# Altium PCB Pod_Islands_Panel.PcbDoc (part 9 of 10)
Units mm, origin at the board's own origin, x right, y up, seen from the top; angles counter-clockwise.
Board outline 95.7 x 83.7 mm, 6 copper layers (Top Layer, Inner1, Inner2, Inner3, Inner4, Bottom Layer), stack 0.82 mm thick; 1100 components, 940 nets, 4944 pads, 3680 vias.
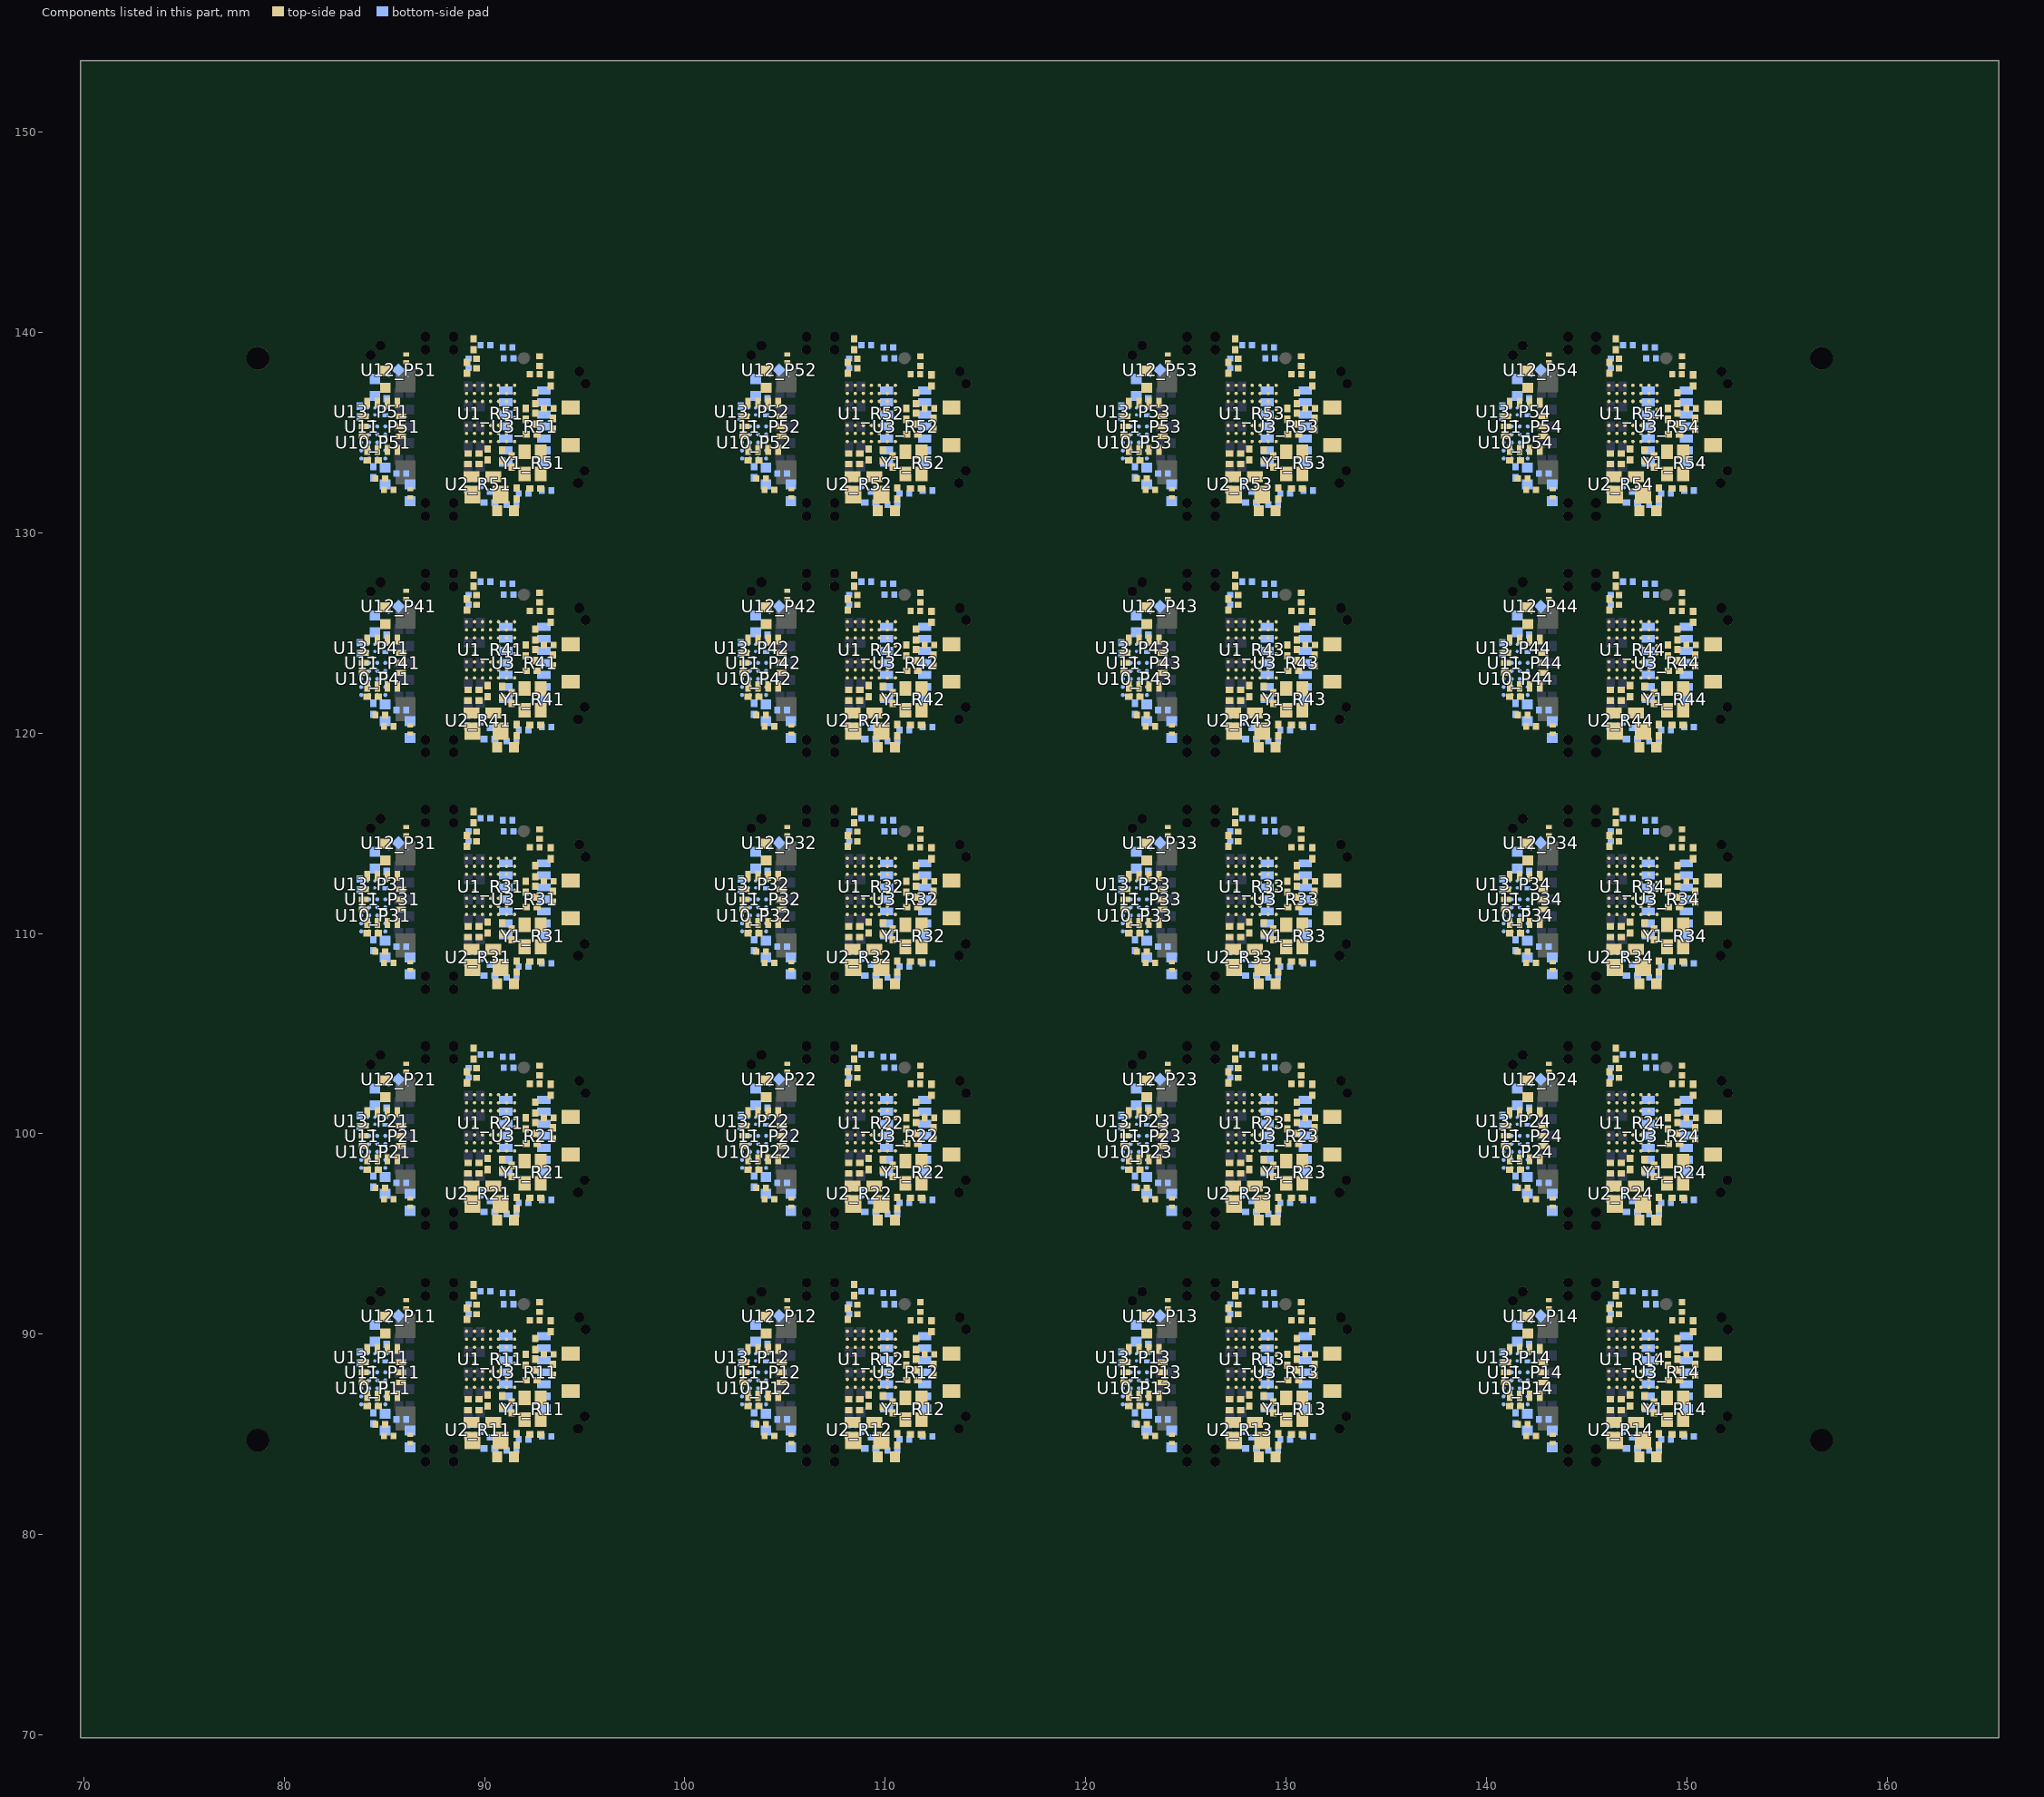
[diagram p13: the components of this part, seen from the top]

## Polygon pours and split planes (outlines as drawn)
GND_R11 on Inner1 (solid, remove dead copper): 87.981,93.649 87.981,82.473 95.855,82.473 95.855,93.649
GND_R11 on Inner4 (solid, remove dead copper): 87.981,93.649 87.981,82.473 95.855,82.473 95.855,93.649
GND_R11 on Top Layer (solid, remove dead copper, pour order 4): 87.981,93.649 87.981,82.473 95.855,82.473 95.855,93.649
GND_R11 on Bottom Layer (solid, remove dead copper, pour order 44): 87.981,93.649 87.981,82.473 95.855,82.473 95.855,93.649
GND_P11 on Inner4 (solid, remove dead copper): 82.981,93.014 82.981,83.108 87.045,83.108 87.045,93.014
GND_P11 on Inner1 (solid, remove dead copper): 82.981,93.014 82.981,83.108 87.045,83.108 87.045,93.014
GND_P21 on Inner4 (solid, remove dead copper): 82.981,104.814 82.981,94.908 87.045,94.908 87.045,104.814
GND_P21 on Inner1 (solid, remove dead copper): 82.981,104.814 82.981,94.908 87.045,94.908 87.045,104.814
GND_R21 on Inner1 (solid, remove dead copper): 87.981,105.449 87.981,94.273 95.855,94.273 95.855,105.449
GND_R21 on Inner4 (solid, remove dead copper): 87.981,105.449 87.981,94.273 95.855,94.273 95.855,105.449
GND_R21 on Top Layer (solid, remove dead copper, pour order 44): 87.981,105.449 87.981,94.273 95.855,94.273 95.855,105.449
GND_R21 on Bottom Layer (solid, remove dead copper, pour order 84): 87.981,105.449 87.981,94.273 95.855,94.273 95.855,105.449
GND_P31 on Inner4 (solid, remove dead copper): 82.981,116.614 82.981,106.708 87.045,106.708 87.045,116.614
GND_P31 on Inner1 (solid, remove dead copper): 82.981,116.614 82.981,106.708 87.045,106.708 87.045,116.614
GND_R31 on Inner1 (solid, remove dead copper): 87.981,117.249 87.981,106.073 95.855,106.073 95.855,117.249
GND_R31 on Inner4 (solid, remove dead copper): 87.981,117.249 87.981,106.073 95.855,106.073 95.855,117.249
GND_R31 on Top Layer (solid, remove dead copper, pour order 80): 87.981,117.249 87.981,106.073 95.855,106.073 95.855,117.249
GND_R31 on Bottom Layer (solid, remove dead copper, pour order 120): 87.981,117.249 87.981,106.073 95.855,106.073 95.855,117.249
GND_P41 on Inner4 (solid, remove dead copper): 82.981,128.414 82.981,118.508 87.045,118.508 87.045,128.414
GND_P41 on Inner1 (solid, remove dead copper): 82.981,128.414 82.981,118.508 87.045,118.508 87.045,128.414
GND_R41 on Inner1 (solid, remove dead copper): 87.981,129.049 87.981,117.873 95.855,117.873 95.855,129.049
GND_R41 on Inner4 (solid, remove dead copper): 87.981,129.049 87.981,117.873 95.855,117.873 95.855,129.049
GND_R41 on Top Layer (solid, remove dead copper, pour order 78): 87.981,129.049 87.981,117.873 95.855,117.873 95.855,129.049
GND_R41 on Bottom Layer (solid, remove dead copper, pour order 118): 87.981,129.049 87.981,117.873 95.855,117.873 95.855,129.049
GND_P51 on Inner4 (solid, remove dead copper): 82.981,140.214 82.981,130.308 87.045,130.308 87.045,140.214
GND_P51 on Inner1 (solid, remove dead copper): 82.981,140.214 82.981,130.308 87.045,130.308 87.045,140.214
GND_R51 on Inner1 (solid, remove dead copper): 87.981,140.849 87.981,129.673 95.855,129.673 95.855,140.849
GND_R51 on Inner4 (solid, remove dead copper): 87.981,140.849 87.981,129.673 95.855,129.673 95.855,140.849
GND_R51 on Top Layer (solid, remove dead copper, pour order 76): 87.981,140.849 87.981,129.673 95.855,129.673 95.855,140.849
GND_R51 on Bottom Layer (solid, remove dead copper, pour order 116): 87.981,140.849 87.981,129.673 95.855,129.673 95.855,140.849
GND_P12 on Inner4 (solid, remove dead copper): 101.981,93.014 101.981,83.108 106.045,83.108 106.045,93.014
GND_P12 on Inner1 (solid, remove dead copper): 101.981,93.014 101.981,83.108 106.045,83.108 106.045,93.014
GND_R12 on Inner1 (solid, remove dead copper): 106.981,93.649 106.981,82.473 114.855,82.473 114.855,93.649
GND_R12 on Inner4 (solid, remove dead copper): 106.981,93.649 106.981,82.473 114.855,82.473 114.855,93.649
GND_R12 on Top Layer (solid, remove dead copper, pour order 74): 106.981,93.649 106.981,82.473 114.855,82.473 114.855,93.649
GND_R12 on Bottom Layer (solid, remove dead copper, pour order 114): 106.981,93.649 106.981,82.473 114.855,82.473 114.855,93.649
GND_P22 on Inner4 (solid, remove dead copper): 101.981,104.814 101.981,94.908 106.045,94.908 106.045,104.814
GND_P22 on Inner1 (solid, remove dead copper): 101.981,104.814 101.981,94.908 106.045,94.908 106.045,104.814
GND_R22 on Inner1 (solid, remove dead copper): 106.981,105.449 106.981,94.273 114.855,94.273 114.855,105.449
GND_R22 on Inner4 (solid, remove dead copper): 106.981,105.449 106.981,94.273 114.855,94.273 114.855,105.449
GND_R22 on Top Layer (solid, remove dead copper, pour order 72): 106.981,105.449 106.981,94.273 114.855,94.273 114.855,105.449
GND_R22 on Bottom Layer (solid, remove dead copper, pour order 112): 106.981,105.449 106.981,94.273 114.855,94.273 114.855,105.449
GND_P32 on Inner4 (solid, remove dead copper): 101.981,116.614 101.981,106.708 106.045,106.708 106.045,116.614
GND_P32 on Inner1 (solid, remove dead copper): 101.981,116.614 101.981,106.708 106.045,106.708 106.045,116.614
GND_R32 on Inner1 (solid, remove dead copper): 106.981,117.249 106.981,106.073 114.855,106.073 114.855,117.249
GND_R32 on Inner4 (solid, remove dead copper): 106.981,117.249 106.981,106.073 114.855,106.073 114.855,117.249
GND_R32 on Top Layer (solid, remove dead copper, pour order 70): 106.981,117.249 106.981,106.073 114.855,106.073 114.855,117.249
GND_R32 on Bottom Layer (solid, remove dead copper, pour order 110): 106.981,117.249 106.981,106.073 114.855,106.073 114.855,117.249
GND_P42 on Inner4 (solid, remove dead copper): 101.981,128.414 101.981,118.508 106.045,118.508 106.045,128.414
GND_P42 on Inner1 (solid, remove dead copper): 101.981,128.414 101.981,118.508 106.045,118.508 106.045,128.414
GND_R42 on Inner1 (solid, remove dead copper): 106.981,129.049 106.981,117.873 114.855,117.873 114.855,129.049
GND_R42 on Inner4 (solid, remove dead copper): 106.981,129.049 106.981,117.873 114.855,117.873 114.855,129.049
GND_R42 on Top Layer (solid, remove dead copper, pour order 68): 106.981,129.049 106.981,117.873 114.855,117.873 114.855,129.049
GND_R42 on Bottom Layer (solid, remove dead copper, pour order 108): 106.981,129.049 106.981,117.873 114.855,117.873 114.855,129.049
GND_P52 on Inner4 (solid, remove dead copper): 101.981,140.214 101.981,130.308 106.045,130.308 106.045,140.214
GND_P52 on Inner1 (solid, remove dead copper): 101.981,140.214 101.981,130.308 106.045,130.308 106.045,140.214
GND_R52 on Inner1 (solid, remove dead copper): 106.981,140.849 106.981,129.673 114.855,129.673 114.855,140.849
GND_R52 on Inner4 (solid, remove dead copper): 106.981,140.849 106.981,129.673 114.855,129.673 114.855,140.849
GND_R52 on Top Layer (solid, remove dead copper, pour order 66): 106.981,140.849 106.981,129.673 114.855,129.673 114.855,140.849
GND_R52 on Bottom Layer (solid, remove dead copper, pour order 106): 106.981,140.849 106.981,129.673 114.855,129.673 114.855,140.849
GND_P13 on Inner4 (solid, remove dead copper): 120.981,93.014 120.981,83.108 125.045,83.108 125.045,93.014
GND_P13 on Inner1 (solid, remove dead copper): 120.981,93.014 120.981,83.108 125.045,83.108 125.045,93.014
GND_R13 on Inner1 (solid, remove dead copper): 125.981,93.649 125.981,82.473 133.855,82.473 133.855,93.649
GND_R13 on Inner4 (solid, remove dead copper): 125.981,93.649 125.981,82.473 133.855,82.473 133.855,93.649
GND_R13 on Top Layer (solid, remove dead copper, pour order 64): 125.981,93.649 125.981,82.473 133.855,82.473 133.855,93.649
GND_R13 on Bottom Layer (solid, remove dead copper, pour order 104): 125.981,93.649 125.981,82.473 133.855,82.473 133.855,93.649
GND_P23 on Inner4 (solid, remove dead copper): 120.981,104.814 120.981,94.908 125.045,94.908 125.045,104.814
GND_P23 on Inner1 (solid, remove dead copper): 120.981,104.814 120.981,94.908 125.045,94.908 125.045,104.814
GND_R23 on Inner1 (solid, remove dead copper): 125.981,105.449 125.981,94.273 133.855,94.273 133.855,105.449
GND_R23 on Inner4 (solid, remove dead copper): 125.981,105.449 125.981,94.273 133.855,94.273 133.855,105.449
GND_R23 on Top Layer (solid, remove dead copper, pour order 62): 125.981,105.449 125.981,94.273 133.855,94.273 133.855,105.449
GND_R23 on Bottom Layer (solid, remove dead copper, pour order 102): 125.981,105.449 125.981,94.273 133.855,94.273 133.855,105.449
GND_P33 on Inner4 (solid, remove dead copper): 120.981,116.614 120.981,106.708 125.045,106.708 125.045,116.614
GND_P33 on Inner1 (solid, remove dead copper): 120.981,116.614 120.981,106.708 125.045,106.708 125.045,116.614
GND_R33 on Inner1 (solid, remove dead copper): 125.981,117.249 125.981,106.073 133.855,106.073 133.855,117.249
GND_R33 on Inner4 (solid, remove dead copper): 125.981,117.249 125.981,106.073 133.855,106.073 133.855,117.249
GND_R33 on Top Layer (solid, remove dead copper, pour order 60): 125.981,117.249 125.981,106.073 133.855,106.073 133.855,117.249
GND_R33 on Bottom Layer (solid, remove dead copper, pour order 100): 125.981,117.249 125.981,106.073 133.855,106.073 133.855,117.249
GND_P43 on Inner4 (solid, remove dead copper): 120.981,128.414 120.981,118.508 125.045,118.508 125.045,128.414
GND_P43 on Inner1 (solid, remove dead copper): 120.981,128.414 120.981,118.508 125.045,118.508 125.045,128.414
GND_R43 on Inner1 (solid, remove dead copper): 125.981,129.049 125.981,117.873 133.855,117.873 133.855,129.049
GND_R43 on Inner4 (solid, remove dead copper): 125.981,129.049 125.981,117.873 133.855,117.873 133.855,129.049
GND_R43 on Top Layer (solid, remove dead copper, pour order 58): 125.981,129.049 125.981,117.873 133.855,117.873 133.855,129.049
GND_R43 on Bottom Layer (solid, remove dead copper, pour order 98): 125.981,129.049 125.981,117.873 133.855,117.873 133.855,129.049
GND_P53 on Inner4 (solid, remove dead copper): 120.981,140.214 120.981,130.308 125.045,130.308 125.045,140.214
GND_P53 on Inner1 (solid, remove dead copper): 120.981,140.214 120.981,130.308 125.045,130.308 125.045,140.214
GND_R53 on Inner1 (solid, remove dead copper): 125.981,140.849 125.981,129.673 133.855,129.673 133.855,140.849
GND_R53 on Inner4 (solid, remove dead copper): 125.981,140.849 125.981,129.673 133.855,129.673 133.855,140.849
GND_R53 on Top Layer (solid, remove dead copper, pour order 56): 125.981,140.849 125.981,129.673 133.855,129.673 133.855,140.849
GND_R53 on Bottom Layer (solid, remove dead copper, pour order 96): 125.981,140.849 125.981,129.673 133.855,129.673 133.855,140.849
GND_P14 on Inner4 (solid, remove dead copper): 139.981,93.014 139.981,83.108 144.045,83.108 144.045,93.014
GND_P14 on Inner1 (solid, remove dead copper): 139.981,93.014 139.981,83.108 144.045,83.108 144.045,93.014
GND_R14 on Inner1 (solid, remove dead copper): 144.981,93.649 144.981,82.473 152.855,82.473 152.855,93.649
GND_R14 on Inner4 (solid, remove dead copper): 144.981,93.649 144.981,82.473 152.855,82.473 152.855,93.649
GND_R14 on Top Layer (solid, remove dead copper, pour order 54): 144.981,93.649 144.981,82.473 152.855,82.473 152.855,93.649
GND_R14 on Bottom Layer (solid, remove dead copper, pour order 94): 144.981,93.649 144.981,82.473 152.855,82.473 152.855,93.649
GND_P24 on Inner4 (solid, remove dead copper): 139.981,104.814 139.981,94.908 144.045,94.908 144.045,104.814
GND_P24 on Inner1 (solid, remove dead copper): 139.981,104.814 139.981,94.908 144.045,94.908 144.045,104.814
GND_R24 on Inner1 (solid, remove dead copper): 144.981,105.449 144.981,94.273 152.855,94.273 152.855,105.449
GND_R24 on Inner4 (solid, remove dead copper): 144.981,105.449 144.981,94.273 152.855,94.273 152.855,105.449
GND_R24 on Top Layer (solid, remove dead copper, pour order 52): 144.981,105.449 144.981,94.273 152.855,94.273 152.855,105.449
GND_R24 on Bottom Layer (solid, remove dead copper, pour order 92): 144.981,105.449 144.981,94.273 152.855,94.273 152.855,105.449
GND_P34 on Inner4 (solid, remove dead copper): 139.981,116.614 139.981,106.708 144.045,106.708 144.045,116.614
GND_P34 on Inner1 (solid, remove dead copper): 139.981,116.614 139.981,106.708 144.045,106.708 144.045,116.614
GND_R34 on Inner1 (solid, remove dead copper): 144.981,117.249 144.981,106.073 152.855,106.073 152.855,117.249
GND_R34 on Inner4 (solid, remove dead copper): 144.981,117.249 144.981,106.073 152.855,106.073 152.855,117.249
GND_R34 on Top Layer (solid, remove dead copper, pour order 50): 144.981,117.249 144.981,106.073 152.855,106.073 152.855,117.249
GND_R34 on Bottom Layer (solid, remove dead copper, pour order 90): 144.981,117.249 144.981,106.073 152.855,106.073 152.855,117.249
GND_P44 on Inner4 (solid, remove dead copper): 139.981,128.414 139.981,118.508 144.045,118.508 144.045,128.414
GND_P44 on Inner1 (solid, remove dead copper): 139.981,128.414 139.981,118.508 144.045,118.508 144.045,128.414
GND_R44 on Inner1 (solid, remove dead copper): 144.981,129.049 144.981,117.873 152.855,117.873 152.855,129.049
GND_R44 on Inner4 (solid, remove dead copper): 144.981,129.049 144.981,117.873 152.855,117.873 152.855,129.049
GND_R44 on Top Layer (solid, remove dead copper, pour order 48): 144.981,129.049 144.981,117.873 152.855,117.873 152.855,129.049
GND_R44 on Bottom Layer (solid, remove dead copper, pour order 88): 144.981,129.049 144.981,117.873 152.855,117.873 152.855,129.049
GND_P54 on Inner4 (solid, remove dead copper): 139.981,140.214 139.981,130.308 144.045,130.308 144.045,140.214
GND_P54 on Inner1 (solid, remove dead copper): 139.981,140.214 139.981,130.308 144.045,130.308 144.045,140.214
GND_R54 on Inner1 (solid, remove dead copper): 144.981,140.849 144.981,129.673 152.855,129.673 152.855,140.849
GND_R54 on Inner4 (solid, remove dead copper): 144.981,140.849 144.981,129.673 152.855,129.673 152.855,140.849
GND_R54 on Top Layer (solid, remove dead copper, pour order 46): 144.981,140.849 144.981,129.673 152.855,129.673 152.855,140.849
GND_R54 on Bottom Layer (solid, remove dead copper, pour order 86): 144.981,140.849 144.981,129.673 152.855,129.673 152.855,140.849

## Keep-outs
Top Layer:
  drawing of 160 lines, arcs and shapes, not listed
Inner1:
  region: 93.66,84.465 93.66,91.735 93.884,91.515 94.093,91.281 94.287,91.034 94.465,90.775 94.626,90.506 94.77,90.227 94.896,89.939 95.003,89.644 95.092,89.343 95.161,89.036 95.21,88.726 95.24,88.414 95.25,88.1 95.24,87.786 95.21,87.474 95.161,87.164 95.092,86.857 95.003,86.556 94.896,86.261 94.77,85.973 94.626,85.694 94.465,85.425 94.287,85.166 94.093,84.919 93.884,84.685 93.66,84.465
  region: 93.66,96.265 93.66,103.535 93.884,103.315 94.093,103.081 94.287,102.834 94.465,102.575 94.626,102.306 94.77,102.027 94.896,101.739 95.003,101.444 95.092,101.143 95.161,100.836 95.21,100.526 95.24,100.214 95.25,99.9 95.24,99.586 95.21,99.274 95.161,98.964 95.092,98.657 95.003,98.356 94.896,98.061 94.77,97.773 94.626,97.494 94.465,97.225 94.287,96.966 94.093,96.719 93.884,96.485 93.66,96.265
  region: 93.66,108.065 93.66,115.335 93.884,115.115 94.093,114.881 94.287,114.634 94.465,114.375 94.626,114.106 94.77,113.827 94.896,113.539 95.003,113.244 95.092,112.943 95.161,112.636 95.21,112.326 95.24,112.014 95.25,111.7 95.24,111.386 95.21,111.074 95.161,110.764 95.092,110.457 95.003,110.156 94.896,109.861 94.77,109.573 94.626,109.294 94.465,109.025 94.287,108.766 94.093,108.519 93.884,108.285 93.66,108.065
  region: 93.66,119.865 93.66,127.135 93.884,126.915 94.093,126.681 94.287,126.434 94.465,126.175 94.626,125.906 94.77,125.627 94.896,125.339 95.003,125.044 95.092,124.743 95.161,124.436 95.21,124.126 95.24,123.814 95.25,123.5 95.24,123.186 95.21,122.874 95.161,122.564 95.092,122.257 95.003,121.956 94.896,121.661 94.77,121.373 94.626,121.094 94.465,120.825 94.287,120.566 94.093,120.319 93.884,120.085 93.66,119.865
  region: 93.66,131.665 93.66,138.935 93.884,138.715 94.093,138.481 94.287,138.234 94.465,137.975 94.626,137.706 94.77,137.427 94.896,137.139 95.003,136.844 95.092,136.543 95.161,136.236 95.21,135.926 95.24,135.614 95.25,135.3 95.24,134.986 95.21,134.674 95.161,134.364 95.092,134.057 95.003,133.756 94.896,133.461 94.77,133.173 94.626,132.894 94.465,132.625 94.287,132.366 94.093,132.119 93.884,131.885 93.66,131.665
  region: 112.66,84.465 112.66,91.735 112.884,91.515 113.093,91.281 113.287,91.034 113.465,90.775 113.626,90.506 113.77,90.227 113.896,89.939 114.003,89.644 114.092,89.343 114.161,89.036 114.21,88.726 114.24,88.414 114.25,88.1 114.24,87.786 114.21,87.474 114.161,87.164 114.092,86.857 114.003,86.556 113.896,86.261 113.77,85.973 113.626,85.694 113.465,85.425 113.287,85.166 113.093,84.919 112.884,84.685 112.66,84.465
  region: 112.66,96.265 112.66,103.535 112.884,103.315 113.093,103.081 113.287,102.834 113.465,102.575 113.626,102.306 113.77,102.027 113.896,101.739 114.003,101.444 114.092,101.143 114.161,100.836 114.21,100.526 114.24,100.214 114.25,99.9 114.24,99.586 114.21,99.274 114.161,98.964 114.092,98.657 114.003,98.356 113.896,98.061 113.77,97.773 113.626,97.494 113.465,97.225 113.287,96.966 113.093,96.719 112.884,96.485 112.66,96.265
  region: 112.66,108.065 112.66,115.335 112.884,115.115 113.093,114.881 113.287,114.634 113.465,114.375 113.626,114.106 113.77,113.827 113.896,113.539 114.003,113.244 114.092,112.943 114.161,112.636 114.21,112.326 114.24,112.014 114.25,111.7 114.24,111.386 114.21,111.074 114.161,110.764 114.092,110.457 114.003,110.156 113.896,109.861 113.77,109.573 113.626,109.294 113.465,109.025 113.287,108.766 113.093,108.519 112.884,108.285 112.66,108.065
  region: 112.66,119.865 112.66,127.135 112.884,126.915 113.093,126.681 113.287,126.434 113.465,126.175 113.626,125.906 113.77,125.627 113.896,125.339 114.003,125.044 114.092,124.743 114.161,124.436 114.21,124.126 114.24,123.814 114.25,123.5 114.24,123.186 114.21,122.874 114.161,122.564 114.092,122.257 114.003,121.956 113.896,121.661 113.77,121.373 113.626,121.094 113.465,120.825 113.287,120.566 113.093,120.319 112.884,120.085 112.66,119.865
  region: 112.66,131.665 112.66,138.935 112.884,138.715 113.093,138.481 113.287,138.234 113.465,137.975 113.626,137.706 113.77,137.427 113.896,137.139 114.003,136.844 114.092,136.543 114.161,136.236 114.21,135.926 114.24,135.614 114.25,135.3 114.24,134.986 114.21,134.674 114.161,134.364 114.092,134.057 114.003,133.756 113.896,133.461 113.77,133.173 113.626,132.894 113.465,132.625 113.287,132.366 113.093,132.119 112.884,131.885 112.66,131.665
  region: 131.66,84.465 131.66,91.735 131.884,91.515 132.093,91.281 132.287,91.034 132.465,90.775 132.626,90.506 132.77,90.227 132.896,89.939 133.003,89.644 133.092,89.343 133.161,89.036 133.21,88.726 133.24,88.414 133.25,88.1 133.24,87.786 133.21,87.474 133.161,87.164 133.092,86.857 133.003,86.556 132.896,86.261 132.77,85.973 132.626,85.694 132.465,85.425 132.287,85.166 132.093,84.919 131.884,84.685 131.66,84.465
  region: 131.66,96.265 131.66,103.535 131.884,103.315 132.093,103.081 132.287,102.834 132.465,102.575 132.626,102.306 132.77,102.027 132.896,101.739 133.003,101.444 133.092,101.143 133.161,100.836 133.21,100.526 133.24,100.214 133.25,99.9 133.24,99.586 133.21,99.274 133.161,98.964 133.092,98.657 133.003,98.356 132.896,98.061 132.77,97.773 132.626,97.494 132.465,97.225 132.287,96.966 132.093,96.719 131.884,96.485 131.66,96.265
  region: 131.66,108.065 131.66,115.335 131.884,115.115 132.093,114.881 132.287,114.634 132.465,114.375 132.626,114.106 132.77,113.827 132.896,113.539 133.003,113.244 133.092,112.943 133.161,112.636 133.21,112.326 133.24,112.014 133.25,111.7 133.24,111.386 133.21,111.074 133.161,110.764 133.092,110.457 133.003,110.156 132.896,109.861 132.77,109.573 132.626,109.294 132.465,109.025 132.287,108.766 132.093,108.519 131.884,108.285 131.66,108.065
  region: 131.66,119.865 131.66,127.135 131.884,126.915 132.093,126.681 132.287,126.434 132.465,126.175 132.626,125.906 132.77,125.627 132.896,125.339 133.003,125.044 133.092,124.743 133.161,124.436 133.21,124.126 133.24,123.814 133.25,123.5 133.24,123.186 133.21,122.874 133.161,122.564 133.092,122.257 133.003,121.956 132.896,121.661 132.77,121.373 132.626,121.094 132.465,120.825 132.287,120.566 132.093,120.319 131.884,120.085 131.66,119.865
  region: 131.66,131.665 131.66,138.935 131.884,138.715 132.093,138.481 132.287,138.234 132.465,137.975 132.626,137.706 132.77,137.427 132.896,137.139 133.003,136.844 133.092,136.543 133.161,136.236 133.21,135.926 133.24,135.614 133.25,135.3 133.24,134.986 133.21,134.674 133.161,134.364 133.092,134.057 133.003,133.756 132.896,133.461 132.77,133.173 132.626,132.894 132.465,132.625 132.287,132.366 132.093,132.119 131.884,131.885 131.66,131.665
  region: 150.66,84.465 150.66,91.735 150.884,91.515 151.093,91.281 151.287,91.034 151.465,90.775 151.626,90.506 151.77,90.227 151.896,89.939 152.003,89.644 152.092,89.343 152.161,89.036 152.21,88.726 152.24,88.414 152.25,88.1 152.24,87.786 152.21,87.474 152.161,87.164 152.092,86.857 152.003,86.556 151.896,86.261 151.77,85.973 151.626,85.694 151.465,85.425 151.287,85.166 151.093,84.919 150.884,84.685 150.66,84.465
  region: 150.66,96.265 150.66,103.535 150.884,103.315 151.093,103.081 151.287,102.834 151.465,102.575 151.626,102.306 151.77,102.027 151.896,101.739 152.003,101.444 152.092,101.143 152.161,100.836 152.21,100.526 152.24,100.214 152.25,99.9 152.24,99.586 152.21,99.274 152.161,98.964 152.092,98.657 152.003,98.356 151.896,98.061 151.77,97.773 151.626,97.494 151.465,97.225 151.287,96.966 151.093,96.719 150.884,96.485 150.66,96.265
  region: 150.66,108.065 150.66,115.335 150.884,115.115 151.093,114.881 151.287,114.634 151.465,114.375 151.626,114.106 151.77,113.827 151.896,113.539 152.003,113.244 152.092,112.943 152.161,112.636 152.21,112.326 152.24,112.014 152.25,111.7 152.24,111.386 152.21,111.074 152.161,110.764 152.092,110.457 152.003,110.156 151.896,109.861 151.77,109.573 151.626,109.294 151.465,109.025 151.287,108.766 151.093,108.519 150.884,108.285 150.66,108.065
  region: 150.66,119.865 150.66,127.135 150.884,126.915 151.093,126.681 151.287,126.434 151.465,126.175 151.626,125.906 151.77,125.627 151.896,125.339 152.003,125.044 152.092,124.743 152.161,124.436 152.21,124.126 152.24,123.814 152.25,123.5 152.24,123.186 152.21,122.874 152.161,122.564 152.092,122.257 152.003,121.956 151.896,121.661 151.77,121.373 151.626,121.094 151.465,120.825 151.287,120.566 151.093,120.319 150.884,120.085 150.66,119.865
  region: 150.66,131.665 150.66,138.935 150.884,138.715 151.093,138.481 151.287,138.234 151.465,137.975 151.626,137.706 151.77,137.427 151.896,137.139 152.003,136.844 152.092,136.543 152.161,136.236 152.21,135.926 152.24,135.614 152.25,135.3 152.24,134.986 152.21,134.674 152.161,134.364 152.092,134.057 152.003,133.756 151.896,133.461 151.77,133.173 151.626,132.894 151.465,132.625 151.287,132.366 151.093,132.119 150.884,131.885 150.66,131.665
Inner2:
  region: 93.66,84.465 93.66,91.735 93.884,91.515 94.093,91.281 94.287,91.034 94.465,90.775 94.626,90.506 94.77,90.227 94.896,89.939 95.003,89.644 95.092,89.343 95.161,89.036 95.21,88.726 95.24,88.414 95.25,88.1 95.24,87.786 95.21,87.474 95.161,87.164 95.092,86.857 95.003,86.556 94.896,86.261 94.77,85.973 94.626,85.694 94.465,85.425 94.287,85.166 94.093,84.919 93.884,84.685 93.66,84.465
  region: 93.66,96.265 93.66,103.535 93.884,103.315 94.093,103.081 94.287,102.834 94.465,102.575 94.626,102.306 94.77,102.027 94.896,101.739 95.003,101.444 95.092,101.143 95.161,100.836 95.21,100.526 95.24,100.214 95.25,99.9 95.24,99.586 95.21,99.274 95.161,98.964 95.092,98.657 95.003,98.356 94.896,98.061 94.77,97.773 94.626,97.494 94.465,97.225 94.287,96.966 94.093,96.719 93.884,96.485 93.66,96.265
  region: 93.66,108.065 93.66,115.335 93.884,115.115 94.093,114.881 94.287,114.634 94.465,114.375 94.626,114.106 94.77,113.827 94.896,113.539 95.003,113.244 95.092,112.943 95.161,112.636 95.21,112.326 95.24,112.014 95.25,111.7 95.24,111.386 95.21,111.074 95.161,110.764 95.092,110.457 95.003,110.156 94.896,109.861 94.77,109.573 94.626,109.294 94.465,109.025 94.287,108.766 94.093,108.519 93.884,108.285 93.66,108.065
  region: 93.66,119.865 93.66,127.135 93.884,126.915 94.093,126.681 94.287,126.434 94.465,126.175 94.626,125.906 94.77,125.627 94.896,125.339 95.003,125.044 95.092,124.743 95.161,124.436 95.21,124.126 95.24,123.814 95.25,123.5 95.24,123.186 95.21,122.874 95.161,122.564 95.092,122.257 95.003,121.956 94.896,121.661 94.77,121.373 94.626,121.094 94.465,120.825 94.287,120.566 94.093,120.319 93.884,120.085 93.66,119.865
  region: 93.66,131.665 93.66,138.935 93.884,138.715 94.093,138.481 94.287,138.234 94.465,137.975 94.626,137.706 94.77,137.427 94.896,137.139 95.003,136.844 95.092,136.543 95.161,136.236 95.21,135.926 95.24,135.614 95.25,135.3 95.24,134.986 95.21,134.674 95.161,134.364 95.092,134.057 95.003,133.756 94.896,133.461 94.77,133.173 94.626,132.894 94.465,132.625 94.287,132.366 94.093,132.119 93.884,131.885 93.66,131.665
  region: 112.66,84.465 112.66,91.735 112.884,91.515 113.093,91.281 113.287,91.034 113.465,90.775 113.626,90.506 113.77,90.227 113.896,89.939 114.003,89.644 114.092,89.343 114.161,89.036 114.21,88.726 114.24,88.414 114.25,88.1 114.24,87.786 114.21,87.474 114.161,87.164 114.092,86.857 114.003,86.556 113.896,86.261 113.77,85.973 113.626,85.694 113.465,85.425 113.287,85.166 113.093,84.919 112.884,84.685 112.66,84.465
  region: 112.66,96.265 112.66,103.535 112.884,103.315 113.093,103.081 113.287,102.834 113.465,102.575 113.626,102.306 113.77,102.027 113.896,101.739 114.003,101.444 114.092,101.143 114.161,100.836 114.21,100.526 114.24,100.214 114.25,99.9 114.24,99.586 114.21,99.274 114.161,98.964 114.092,98.657 114.003,98.356 113.896,98.061 113.77,97.773 113.626,97.494 113.465,97.225 113.287,96.966 113.093,96.719 112.884,96.485 112.66,96.265
  region: 112.66,108.065 112.66,115.335 112.884,115.115 113.093,114.881 113.287,114.634 113.465,114.375 113.626,114.106 113.77,113.827 113.896,113.539 114.003,113.244 114.092,112.943 114.161,112.636 114.21,112.326 114.24,112.014 114.25,111.7 114.24,111.386 114.21,111.074 114.161,110.764 114.092,110.457 114.003,110.156 113.896,109.861 113.77,109.573 113.626,109.294 113.465,109.025 113.287,108.766 113.093,108.519 112.884,108.285 112.66,108.065
  region: 112.66,119.865 112.66,127.135 112.884,126.915 113.093,126.681 113.287,126.434 113.465,126.175 113.626,125.906 113.77,125.627 113.896,125.339 114.003,125.044 114.092,124.743 114.161,124.436 114.21,124.126 114.24,123.814 114.25,123.5 114.24,123.186 114.21,122.874 114.161,122.564 114.092,122.257 114.003,121.956 113.896,121.661 113.77,121.373 113.626,121.094 113.465,120.825 113.287,120.566 113.093,120.319 112.884,120.085 112.66,119.865
  region: 112.66,131.665 112.66,138.935 112.884,138.715 113.093,138.481 113.287,138.234 113.465,137.975 113.626,137.706 113.77,137.427 113.896,137.139 114.003,136.844 114.092,136.543 114.161,136.236 114.21,135.926 114.24,135.614 114.25,135.3 114.24,134.986 114.21,134.674 114.161,134.364 114.092,134.057 114.003,133.756 113.896,133.461 113.77,133.173 113.626,132.894 113.465,132.625 113.287,132.366 113.093,132.119 112.884,131.885 112.66,131.665
  region: 131.66,84.465 131.66,91.735 131.884,91.515 132.093,91.281 132.287,91.034 132.465,90.775 132.626,90.506 132.77,90.227 132.896,89.939 133.003,89.644 133.092,89.343 133.161,89.036 133.21,88.726 133.24,88.414 133.25,88.1 133.24,87.786 133.21,87.474 133.161,87.164 133.092,86.857 133.003,86.556 132.896,86.261 132.77,85.973 132.626,85.694 132.465,85.425 132.287,85.166 132.093,84.919 131.884,84.685 131.66,84.465
  region: 131.66,96.265 131.66,103.535 131.884,103.315 132.093,103.081 132.287,102.834 132.465,102.575 132.626,102.306 132.77,102.027 132.896,101.739 133.003,101.444 133.092,101.143 133.161,100.836 133.21,100.526 133.24,100.214 133.25,99.9 133.24,99.586 133.21,99.274 133.161,98.964 133.092,98.657 133.003,98.356 132.896,98.061 132.77,97.773 132.626,97.494 132.465,97.225 132.287,96.966 132.093,96.719 131.884,96.485 131.66,96.265
  region: 131.66,108.065 131.66,115.335 131.884,115.115 132.093,114.881 132.287,114.634 132.465,114.375 132.626,114.106 132.77,113.827 132.896,113.539 133.003,113.244 133.092,112.943 133.161,112.636 133.21,112.326 133.24,112.014 133.25,111.7 133.24,111.386 133.21,111.074 133.161,110.764 133.092,110.457 133.003,110.156 132.896,109.861 132.77,109.573 132.626,109.294 132.465,109.025 132.287,108.766 132.093,108.519 131.884,108.285 131.66,108.065
  region: 131.66,119.865 131.66,127.135 131.884,126.915 132.093,126.681 132.287,126.434 132.465,126.175 132.626,125.906 132.77,125.627 132.896,125.339 133.003,125.044 133.092,124.743 133.161,124.436 133.21,124.126 133.24,123.814 133.25,123.5 133.24,123.186 133.21,122.874 133.161,122.564 133.092,122.257 133.003,121.956 132.896,121.661 132.77,121.373 132.626,121.094 132.465,120.825 132.287,120.566 132.093,120.319 131.884,120.085 131.66,119.865
  region: 131.66,131.665 131.66,138.935 131.884,138.715 132.093,138.481 132.287,138.234 132.465,137.975 132.626,137.706 132.77,137.427 132.896,137.139 133.003,136.844 133.092,136.543 133.161,136.236 133.21,135.926 133.24,135.614 133.25,135.3 133.24,134.986 133.21,134.674 133.161,134.364 133.092,134.057 133.003,133.756 132.896,133.461 132.77,133.173 132.626,132.894 132.465,132.625 132.287,132.366 132.093,132.119 131.884,131.885 131.66,131.665
  region: 150.66,84.465 150.66,91.735 150.884,91.515 151.093,91.281 151.287,91.034 151.465,90.775 151.626,90.506 151.77,90.227 151.896,89.939 152.003,89.644 152.092,89.343 152.161,89.036 152.21,88.726 152.24,88.414 152.25,88.1 152.24,87.786 152.21,87.474 152.161,87.164 152.092,86.857 152.003,86.556 151.896,86.261 151.77,85.973 151.626,85.694 151.465,85.425 151.287,85.166 151.093,84.919 150.884,84.685 150.66,84.465
  region: 150.66,96.265 150.66,103.535 150.884,103.315 151.093,103.081 151.287,102.834 151.465,102.575 151.626,102.306 151.77,102.027 151.896,101.739 152.003,101.444 152.092,101.143 152.161,100.836 152.21,100.526 152.24,100.214 152.25,99.9 152.24,99.586 152.21,99.274 152.161,98.964 152.092,98.657 152.003,98.356 151.896,98.061 151.77,97.773 151.626,97.494 151.465,97.225 151.287,96.966 151.093,96.719 150.884,96.485 150.66,96.265
  region: 150.66,108.065 150.66,115.335 150.884,115.115 151.093,114.881 151.287,114.634 151.465,114.375 151.626,114.106 151.77,113.827 151.896,113.539 152.003,113.244 152.092,112.943 152.161,112.636 152.21,112.326 152.24,112.014 152.25,111.7 152.24,111.386 152.21,111.074 152.161,110.764 152.092,110.457 152.003,110.156 151.896,109.861 151.77,109.573 151.626,109.294 151.465,109.025 151.287,108.766 151.093,108.519 150.884,108.285 150.66,108.065
  region: 150.66,119.865 150.66,127.135 150.884,126.915 151.093,126.681 151.287,126.434 151.465,126.175 151.626,125.906 151.77,125.627 151.896,125.339 152.003,125.044 152.092,124.743 152.161,124.436 152.21,124.126 152.24,123.814 152.25,123.5 152.24,123.186 152.21,122.874 152.161,122.564 152.092,122.257 152.003,121.956 151.896,121.661 151.77,121.373 151.626,121.094 151.465,120.825 151.287,120.566 151.093,120.319 150.884,120.085 150.66,119.865
  region: 150.66,131.665 150.66,138.935 150.884,138.715 151.093,138.481 151.287,138.234 151.465,137.975 151.626,137.706 151.77,137.427 151.896,137.139 152.003,136.844 152.092,136.543 152.161,136.236 152.21,135.926 152.24,135.614 152.25,135.3 152.24,134.986 152.21,134.674 152.161,134.364 152.092,134.057 152.003,133.756 151.896,133.461 151.77,133.173 151.626,132.894 151.465,132.625 151.287,132.366 151.093,132.119 150.884,131.885 150.66,131.665
Inner3:
  region: 93.66,84.465 93.66,91.735 93.884,91.515 94.093,91.281 94.287,91.034 94.465,90.775 94.626,90.506 94.77,90.227 94.896,89.939 95.003,89.644 95.092,89.343 95.161,89.036 95.21,88.726 95.24,88.414 95.25,88.1 95.24,87.786 95.21,87.474 95.161,87.164 95.092,86.857 95.003,86.556 94.896,86.261 94.77,85.973 94.626,85.694 94.465,85.425 94.287,85.166 94.093,84.919 93.884,84.685 93.66,84.465
  region: 93.66,96.265 93.66,103.535 93.884,103.315 94.093,103.081 94.287,102.834 94.465,102.575 94.626,102.306 94.77,102.027 94.896,101.739 95.003,101.444 95.092,101.143 95.161,100.836 95.21,100.526 95.24,100.214 95.25,99.9 95.24,99.586 95.21,99.274 95.161,98.964 95.092,98.657 95.003,98.356 94.896,98.061 94.77,97.773 94.626,97.494 94.465,97.225 94.287,96.966 94.093,96.719 93.884,96.485 93.66,96.265
  region: 93.66,108.065 93.66,115.335 93.884,115.115 94.093,114.881 94.287,114.634 94.465,114.375 94.626,114.106 94.77,113.827 94.896,113.539 95.003,113.244 95.092,112.943 95.161,112.636 95.21,112.326 95.24,112.014 95.25,111.7 95.24,111.386 95.21,111.074 95.161,110.764 95.092,110.457 95.003,110.156 94.896,109.861 94.77,109.573 94.626,109.294 94.465,109.025 94.287,108.766 94.093,108.519 93.884,108.285 93.66,108.065
  region: 93.66,119.865 93.66,127.135 93.884,126.915 94.093,126.681 94.287,126.434 94.465,126.175 94.626,125.906 94.77,125.627 94.896,125.339 95.003,125.044 95.092,124.743 95.161,124.436 95.21,124.126 95.24,123.814 95.25,123.5 95.24,123.186 95.21,122.874 95.161,122.564 95.092,122.257 95.003,121.956 94.896,121.661 94.77,121.373 94.626,121.094 94.465,120.825 94.287,120.566 94.093,120.319 93.884,120.085 93.66,119.865
  region: 93.66,131.665 93.66,138.935 93.884,138.715 94.093,138.481 94.287,138.234 94.465,137.975 94.626,137.706 94.77,137.427 94.896,137.139 95.003,136.844 95.092,136.543 95.161,136.236 95.21,135.926 95.24,135.614 95.25,135.3 95.24,134.986 95.21,134.674 95.161,134.364 95.092,134.057 95.003,133.756 94.896,133.461 94.77,133.173 94.626,132.894 94.465,132.625 94.287,132.366 94.093,132.119 93.884,131.885 93.66,131.665
  region: 112.66,84.465 112.66,91.735 112.884,91.515 113.093,91.281 113.287,91.034 113.465,90.775 113.626,90.506 113.77,90.227 113.896,89.939 114.003,89.644 114.092,89.343 114.161,89.036 114.21,88.726 114.24,88.414 114.25,88.1 114.24,87.786 114.21,87.474 114.161,87.164 114.092,86.857 114.003,86.556 113.896,86.261 113.77,85.973 113.626,85.694 113.465,85.425 113.287,85.166 113.093,84.919 112.884,84.685 112.66,84.465
  region: 112.66,96.265 112.66,103.535 112.884,103.315 113.093,103.081 113.287,102.834 113.465,102.575 113.626,102.306 113.77,102.027 113.896,101.739 114.003,101.444 114.092,101.143 114.161,100.836 114.21,100.526 114.24,100.214 114.25,99.9 114.24,99.586 114.21,99.274 114.161,98.964 114.092,98.657 114.003,98.356 113.896,98.061 113.77,97.773 113.626,97.494 113.465,97.225 113.287,96.966 113.093,96.719 112.884,96.485 112.66,96.265
  region: 112.66,108.065 112.66,115.335 112.884,115.115 113.093,114.881 113.287,114.634 113.465,114.375 113.626,114.106 113.77,113.827 113.896,113.539 114.003,113.244 114.092,112.943 114.161,112.636 114.21,112.326 114.24,112.014 114.25,111.7 114.24,111.386 114.21,111.074 114.161,110.764 114.092,110.457 114.003,110.156 113.896,109.861 113.77,109.573 113.626,109.294 113.465,109.025 113.287,108.766 113.093,108.519 112.884,108.285 112.66,108.065
  region: 112.66,119.865 112.66,127.135 112.884,126.915 113.093,126.681 113.287,126.434 113.465,126.175 113.626,125.906 113.77,125.627 113.896,125.339 114.003,125.044 114.092,124.743 114.161,124.436 114.21,124.126 114.24,123.814 114.25,123.5 114.24,123.186 114.21,122.874 114.161,122.564 114.092,122.257 114.003,121.956 113.896,121.661 113.77,121.373 113.626,121.094 113.465,120.825 113.287,120.566 113.093,120.319 112.884,120.085 112.66,119.865
  region: 112.66,131.665 112.66,138.935 112.884,138.715 113.093,138.481 113.287,138.234 113.465,137.975 113.626,137.706 113.77,137.427 113.896,137.139 114.003,136.844 114.092,136.543 114.161,136.236 114.21,135.926 114.24,135.614 114.25,135.3 114.24,134.986 114.21,134.674 114.161,134.364 114.092,134.057 114.003,133.756 113.896,133.461 113.77,133.173 113.626,132.894 113.465,132.625 113.287,132.366 113.093,132.119 112.884,131.885 112.66,131.665
  region: 131.66,84.465 131.66,91.735 131.884,91.515 132.093,91.281 132.287,91.034 132.465,90.775 132.626,90.506 132.77,90.227 132.896,89.939 133.003,89.644 133.092,89.343 133.161,89.036 133.21,88.726 133.24,88.414 133.25,88.1 133.24,87.786 133.21,87.474 133.161,87.164 133.092,86.857 133.003,86.556 132.896,86.261 132.77,85.973 132.626,85.694 132.465,85.425 132.287,85.166 132.093,84.919 131.884,84.685 131.66,84.465
  region: 131.66,96.265 131.66,103.535 131.884,103.315 132.093,103.081 132.287,102.834 132.465,102.575 132.626,102.306 132.77,102.027 132.896,101.739 133.003,101.444 133.092,101.143 133.161,100.836 133.21,100.526 133.24,100.214 133.25,99.9 133.24,99.586 133.21,99.274 133.161,98.964 133.092,98.657 133.003,98.356 132.896,98.061 132.77,97.773 132.626,97.494 132.465,97.225 132.287,96.966 132.093,96.719 131.884,96.485 131.66,96.265
  region: 131.66,108.065 131.66,115.335 131.884,115.115 132.093,114.881 132.287,114.634 132.465,114.375 132.626,114.106 132.77,113.827 132.896,113.539 133.003,113.244 133.092,112.943 133.161,112.636 133.21,112.326 133.24,112.014 133.25,111.7 133.24,111.386 133.21,111.074 133.161,110.764 133.092,110.457 133.003,110.156 132.896,109.861 132.77,109.573 132.626,109.294 132.465,109.025 132.287,108.766 132.093,108.519 131.884,108.285 131.66,108.065
  region: 131.66,119.865 131.66,127.135 131.884,126.915 132.093,126.681 132.287,126.434 132.465,126.175 132.626,125.906 132.77,125.627 132.896,125.339 133.003,125.044 133.092,124.743 133.161,124.436 133.21,124.126 133.24,123.814 133.25,123.5 133.24,123.186 133.21,122.874 133.161,122.564 133.092,122.257 133.003,121.956 132.896,121.661 132.77,121.373 132.626,121.094 132.465,120.825 132.287,120.566 132.093,120.319 131.884,120.085 131.66,119.865
  region: 131.66,131.665 131.66,138.935 131.884,138.715 132.093,138.481 132.287,138.234 132.465,137.975 132.626,137.706 132.77,137.427 132.896,137.139 133.003,136.844 133.092,136.543 133.161,136.236 133.21,135.926 133.24,135.614 133.25,135.3 133.24,134.986 133.21,134.674 133.161,134.364 133.092,134.057 133.003,133.756 132.896,133.461 132.77,133.173 132.626,132.894 132.465,132.625 132.287,132.366 132.093,132.119 131.884,131.885 131.66,131.665
  region: 150.66,84.465 150.66,91.735 150.884,91.515 151.093,91.281 151.287,91.034 151.465,90.775 151.626,90.506 151.77,90.227 151.896,89.939 152.003,89.644 152.092,89.343 152.161,89.036 152.21,88.726 152.24,88.414 152.25,88.1 152.24,87.786 152.21,87.474 152.161,87.164 152.092,86.857 152.003,86.556 151.896,86.261 151.77,85.973 151.626,85.694 151.465,85.425 151.287,85.166 151.093,84.919 150.884,84.685 150.66,84.465
  region: 150.66,96.265 150.66,103.535 150.884,103.315 151.093,103.081 151.287,102.834 151.465,102.575 151.626,102.306 151.77,102.027 151.896,101.739 152.003,101.444 152.092,101.143 152.161,100.836 152.21,100.526 152.24,100.214 152.25,99.9 152.24,99.586 152.21,99.274 152.161,98.964 152.092,98.657 152.003,98.356 151.896,98.061 151.77,97.773 151.626,97.494 151.465,97.225 151.287,96.966 151.093,96.719 150.884,96.485 150.66,96.265
  region: 150.66,108.065 150.66,115.335 150.884,115.115 151.093,114.881 151.287,114.634 151.465,114.375 151.626,114.106 151.77,113.827 151.896,113.539 152.003,113.244 152.092,112.943 152.161,112.636 152.21,112.326 152.24,112.014 152.25,111.7 152.24,111.386 152.21,111.074 152.161,110.764 152.092,110.457 152.003,110.156 151.896,109.861 151.77,109.573 151.626,109.294 151.465,109.025 151.287,108.766 151.093,108.519 150.884,108.285 150.66,108.065
  region: 150.66,119.865 150.66,127.135 150.884,126.915 151.093,126.681 151.287,126.434 151.465,126.175 151.626,125.906 151.77,125.627 151.896,125.339 152.003,125.044 152.092,124.743 152.161,124.436 152.21,124.126 152.24,123.814 152.25,123.5 152.24,123.186 152.21,122.874 152.161,122.564 152.092,122.257 152.003,121.956 151.896,121.661 151.77,121.373 151.626,121.094 151.465,120.825 151.287,120.566 151.093,120.319 150.884,120.085 150.66,119.865
  region: 150.66,131.665 150.66,138.935 150.884,138.715 151.093,138.481 151.287,138.234 151.465,137.975 151.626,137.706 151.77,137.427 151.896,137.139 152.003,136.844 152.092,136.543 152.161,136.236 152.21,135.926 152.24,135.614 152.25,135.3 152.24,134.986 152.21,134.674 152.161,134.364 152.092,134.057 152.003,133.756 151.896,133.461 151.77,133.173 151.626,132.894 151.465,132.625 151.287,132.366 151.093,132.119 150.884,131.885 150.66,131.665
Inner4:
  region: 93.66,84.465 93.66,91.735 93.884,91.515 94.093,91.281 94.287,91.034 94.465,90.775 94.626,90.506 94.77,90.227 94.896,89.939 95.003,89.644 95.092,89.343 95.161,89.036 95.21,88.726 95.24,88.414 95.25,88.1 95.24,87.786 95.21,87.474 95.161,87.164 95.092,86.857 95.003,86.556 94.896,86.261 94.77,85.973 94.626,85.694 94.465,85.425 94.287,85.166 94.093,84.919 93.884,84.685 93.66,84.465
  region: 93.66,96.265 93.66,103.535 93.884,103.315 94.093,103.081 94.287,102.834 94.465,102.575 94.626,102.306 94.77,102.027 94.896,101.739 95.003,101.444 95.092,101.143 95.161,100.836 95.21,100.526 95.24,100.214 95.25,99.9 95.24,99.586 95.21,99.274 95.161,98.964 95.092,98.657 95.003,98.356 94.896,98.061 94.77,97.773 94.626,97.494 94.465,97.225 94.287,96.966 94.093,96.719 93.884,96.485 93.66,96.265
  region: 93.66,108.065 93.66,115.335 93.884,115.115 94.093,114.881 94.287,114.634 94.465,114.375 94.626,114.106 94.77,113.827 94.896,113.539 95.003,113.244 95.092,112.943 95.161,112.636 95.21,112.326 95.24,112.014 95.25,111.7 95.24,111.386 95.21,111.074 95.161,110.764 95.092,110.457 95.003,110.156 94.896,109.861 94.77,109.573 94.626,109.294 94.465,109.025 94.287,108.766 94.093,108.519 93.884,108.285 93.66,108.065
  region: 93.66,119.865 93.66,127.135 93.884,126.915 94.093,126.681 94.287,126.434 94.465,126.175 94.626,125.906 94.77,125.627 94.896,125.339 95.003,125.044 95.092,124.743 95.161,124.436 95.21,124.126 95.24,123.814 95.25,123.5 95.24,123.186 95.21,122.874 95.161,122.564 95.092,122.257 95.003,121.956 94.896,121.661 94.77,121.373 94.626,121.094 94.465,120.825 94.287,120.566 94.093,120.319 93.884,120.085 93.66,119.865
  region: 93.66,131.665 93.66,138.935 93.884,138.715 94.093,138.481 94.287,138.234 94.465,137.975 94.626,137.706 94.77,137.427 94.896,137.139 95.003,136.844 95.092,136.543 95.161,136.236 95.21,135.926 95.24,135.614 95.25,135.3 95.24,134.986 95.21,134.674 95.161,134.364 95.092,134.057 95.003,133.756 94.896,133.461 94.77,133.173 94.626,132.894 94.465,132.625 94.287,132.366 94.093,132.119 93.884,131.885 93.66,131.665
  region: 112.66,84.465 112.66,91.735 112.884,91.515 113.093,91.281 113.287,91.034 113.465,90.775 113.626,90.506 113.77,90.227 113.896,89.939 114.003,89.644 114.092,89.343 114.161,89.036 114.21,88.726 114.24,88.414 114.25,88.1 114.24,87.786 114.21,87.474 114.161,87.164 114.092,86.857 114.003,86.556 113.896,86.261 113.77,85.973 113.626,85.694 113.465,85.425 113.287,85.166 113.093,84.919 112.884,84.685 112.66,84.465
  region: 112.66,96.265 112.66,103.535 112.884,103.315 113.093,103.081 113.287,102.834 113.465,102.575 113.626,102.306 113.77,102.027 113.896,101.739 114.003,101.444 114.092,101.143 114.161,100.836 114.21,100.526 114.24,100.214 114.25,99.9 114.24,99.586 114.21,99.274 114.161,98.964 114.092,98.657 114.003,98.356 113.896,98.061 113.77,97.773 113.626,97.494 113.465,97.225 113.287,96.966 113.093,96.719 112.884,96.485 112.66,96.265
  region: 112.66,108.065 112.66,115.335 112.884,115.115 113.093,114.881 113.287,114.634 113.465,114.375 113.626,114.106 113.77,113.827 113.896,113.539 114.003,113.244 114.092,112.943 114.161,112.636 114.21,112.326 114.24,112.014 114.25,111.7 114.24,111.386 114.21,111.074 114.161,110.764 114.092,110.457 114.003,110.156 113.896,109.861 113.77,109.573 113.626,109.294 113.465,109.025 113.287,108.766 113.093,108.519 112.884,108.285 112.66,108.065
  region: 112.66,119.865 112.66,127.135 112.884,126.915 113.093,126.681 113.287,126.434 113.465,126.175 113.626,125.906 113.77,125.627 113.896,125.339 114.003,125.044 114.092,124.743 114.161,124.436 114.21,124.126 114.24,123.814 114.25,123.5 114.24,123.186 114.21,122.874 114.161,122.564 114.092,122.257 114.003,121.956 113.896,121.661 113.77,121.373 113.626,121.094 113.465,120.825 113.287,120.566 113.093,120.319 112.884,120.085 112.66,119.865
  region: 112.66,131.665 112.66,138.935 112.884,138.715 113.093,138.481 113.287,138.234 113.465,137.975 113.626,137.706 113.77,137.427 113.896,137.139 114.003,136.844 114.092,136.543 114.161,136.236 114.21,135.926 114.24,135.614 114.25,135.3 114.24,134.986 114.21,134.674 114.161,134.364 114.092,134.057 114.003,133.756 113.896,133.461 113.77,133.173 113.626,132.894 113.465,132.625 113.287,132.366 113.093,132.119 112.884,131.885 112.66,131.665
  region: 131.66,84.465 131.66,91.735 131.884,91.515 132.093,91.281 132.287,91.034 132.465,90.775 132.626,90.506 132.77,90.227 132.896,89.939 133.003,89.644 133.092,89.343 133.161,89.036 133.21,88.726 133.24,88.414 133.25,88.1 133.24,87.786 133.21,87.474 133.161,87.164 133.092,86.857 133.003,86.556 132.896,86.261 132.77,85.973 132.626,85.694 132.465,85.425 132.287,85.166 132.093,84.919 131.884,84.685 131.66,84.465
  region: 131.66,96.265 131.66,103.535 131.884,103.315 132.093,103.081 132.287,102.834 132.465,102.575 132.626,102.306 132.77,102.027 132.896,101.739 133.003,101.444 133.092,101.143 133.161,100.836 133.21,100.526 133.24,100.214 133.25,99.9 133.24,99.586 133.21,99.274 133.161,98.964 133.092,98.657 133.003,98.356 132.896,98.061 132.77,97.773 132.626,97.494 132.465,97.225 132.287,96.966 132.093,96.719 131.884,96.485 131.66,96.265
  region: 131.66,108.065 131.66,115.335 131.884,115.115 132.093,114.881 132.287,114.634 132.465,114.375 132.626,114.106 132.77,113.827 132.896,113.539 133.003,113.244 133.092,112.943 133.161,112.636 133.21,112.326 133.24,112.014 133.25,111.7 133.24,111.386 133.21,111.074 133.161,110.764 133.092,110.457 133.003,110.156 132.896,109.861 132.77,109.573 132.626,109.294 132.465,109.025 132.287,108.766 132.093,108.519 131.884,108.285 131.66,108.065
  region: 131.66,119.865 131.66,127.135 131.884,126.915 132.093,126.681 132.287,126.434 132.465,126.175 132.626,125.906 132.77,125.627 132.896,125.339 133.003,125.044 133.092,124.743 133.161,124.436 133.21,124.126 133.24,123.814 133.25,123.5 133.24,123.186 133.21,122.874 133.161,122.564 133.092,122.257 133.003,121.956 132.896,121.661 132.77,121.373 132.626,121.094 132.465,120.825 132.287,120.566 132.093,120.319 131.884,120.085 131.66,119.865
  region: 131.66,131.665 131.66,138.935 131.884,138.715 132.093,138.481 132.287,138.234 132.465,137.975 132.626,137.706 132.77,137.427 132.896,137.139 133.003,136.844 133.092,136.543 133.161,136.236 133.21,135.926 133.24,135.614 133.25,135.3 133.24,134.986 133.21,134.674 133.161,134.364 133.092,134.057 133.003,133.756 132.896,133.461 132.77,133.173 132.626,132.894 132.465,132.625 132.287,132.366 132.093,132.119 131.884,131.885 131.66,131.665
  region: 150.66,84.465 150.66,91.735 150.884,91.515 151.093,91.281 151.287,91.034 151.465,90.775 151.626,90.506 151.77,90.227 151.896,89.939 152.003,89.644 152.092,89.343 152.161,89.036 152.21,88.726 152.24,88.414 152.25,88.1 152.24,87.786 152.21,87.474 152.161,87.164 152.092,86.857 152.003,86.556 151.896,86.261 151.77,85.973 151.626,85.694 151.465,85.425 151.287,85.166 151.093,84.919 150.884,84.685 150.66,84.465
  region: 150.66,96.265 150.66,103.535 150.884,103.315 151.093,103.081 151.287,102.834 151.465,102.575 151.626,102.306 151.77,102.027 151.896,101.739 152.003,101.444 152.092,101.143 152.161,100.836 152.21,100.526 152.24,100.214 152.25,99.9 152.24,99.586 152.21,99.274 152.161,98.964 152.092,98.657 152.003,98.356 151.896,98.061 151.77,97.773 151.626,97.494 151.465,97.225 151.287,96.966 151.093,96.719 150.884,96.485 150.66,96.265
  region: 150.66,108.065 150.66,115.335 150.884,115.115 151.093,114.881 151.287,114.634 151.465,114.375 151.626,114.106 151.77,113.827 151.896,113.539 152.003,113.244 152.092,112.943 152.161,112.636 152.21,112.326 152.24,112.014 152.25,111.7 152.24,111.386 152.21,111.074 152.161,110.764 152.092,110.457 152.003,110.156 151.896,109.861 151.77,109.573 151.626,109.294 151.465,109.025 151.287,108.766 151.093,108.519 150.884,108.285 150.66,108.065
  region: 150.66,119.865 150.66,127.135 150.884,126.915 151.093,126.681 151.287,126.434 151.465,126.175 151.626,125.906 151.77,125.627 151.896,125.339 152.003,125.044 152.092,124.743 152.161,124.436 152.21,124.126 152.24,123.814 152.25,123.5 152.24,123.186 152.21,122.874 152.161,122.564 152.092,122.257 152.003,121.956 151.896,121.661 151.77,121.373 151.626,121.094 151.465,120.825 151.287,120.566 151.093,120.319 150.884,120.085 150.66,119.865
  region: 150.66,131.665 150.66,138.935 150.884,138.715 151.093,138.481 151.287,138.234 151.465,137.975 151.626,137.706 151.77,137.427 151.896,137.139 152.003,136.844 152.092,136.543 152.161,136.236 152.21,135.926 152.24,135.614 152.25,135.3 152.24,134.986 152.21,134.674 152.161,134.364 152.092,134.057 152.003,133.756 151.896,133.461 151.77,133.173 151.626,132.894 151.465,132.625 151.287,132.366 151.093,132.119 150.884,131.885 150.66,131.665
Bottom Layer:
  drawing of 140 lines, arcs and shapes, not listed
Board Outline Layer:
  drawing of 17200 lines, arcs and shapes, not listed